# Altium PCB PCB_STM32-v1.1.PcbDoc (part 1 of 3)
Units mil, origin at the board's own origin, x right, y up, seen from the top; angles counter-clockwise.
Board outline 4000 x 2000 mil, 2 copper layers (Top Layer, Bottom Layer), stack 61.811 mil thick; 77 components, 88 nets, 371 pads, 188 vias.
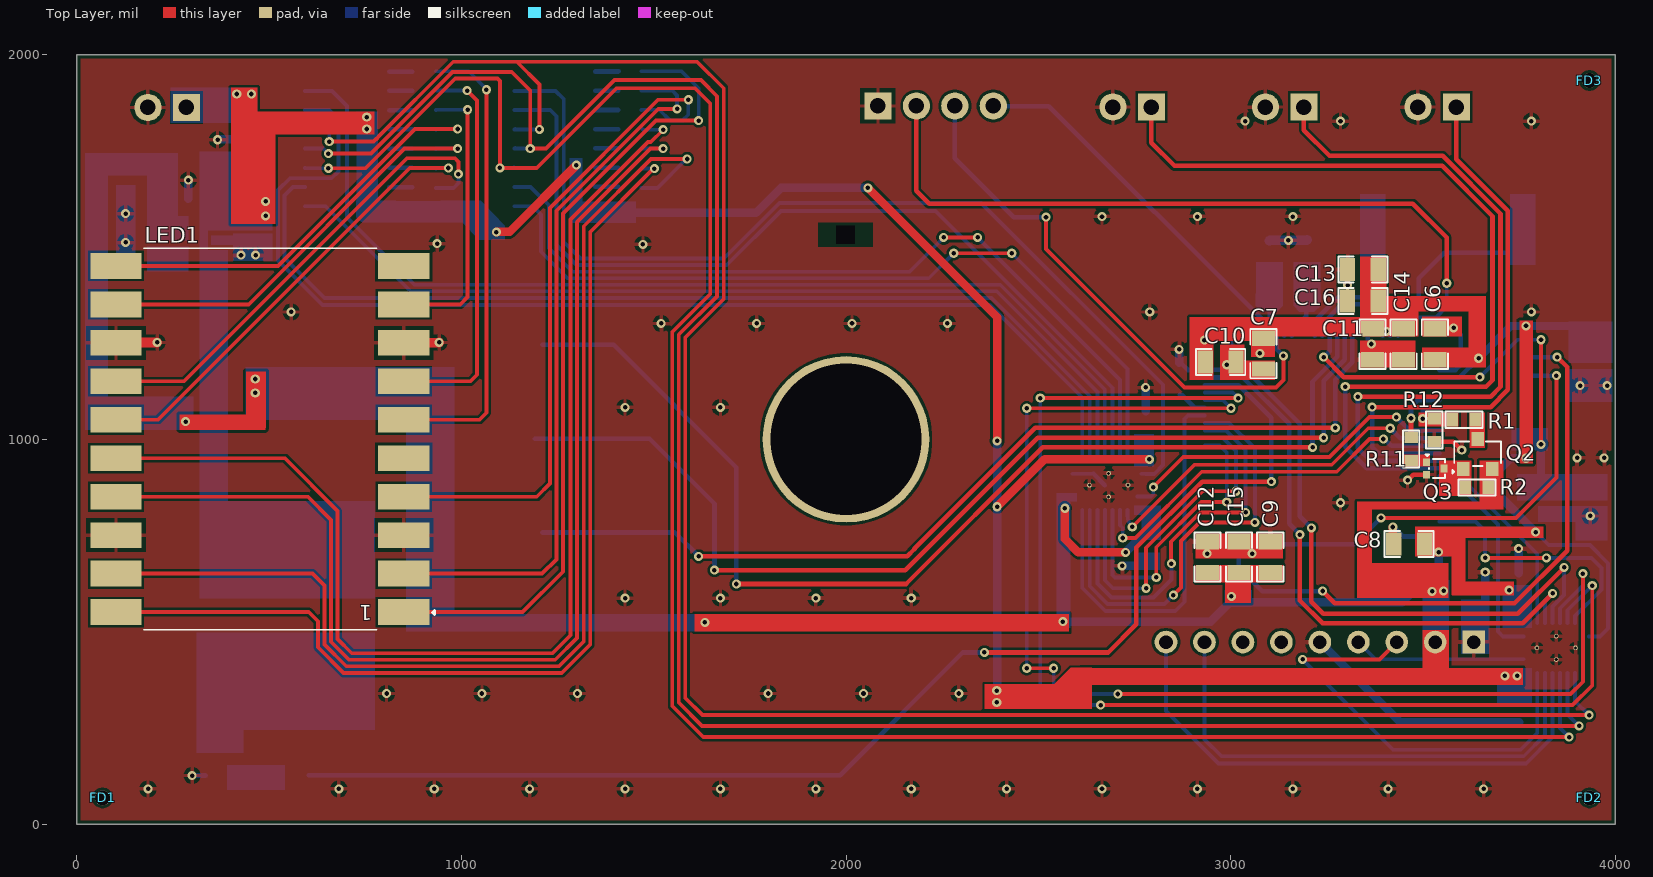
[diagram p0: Top Layer view]
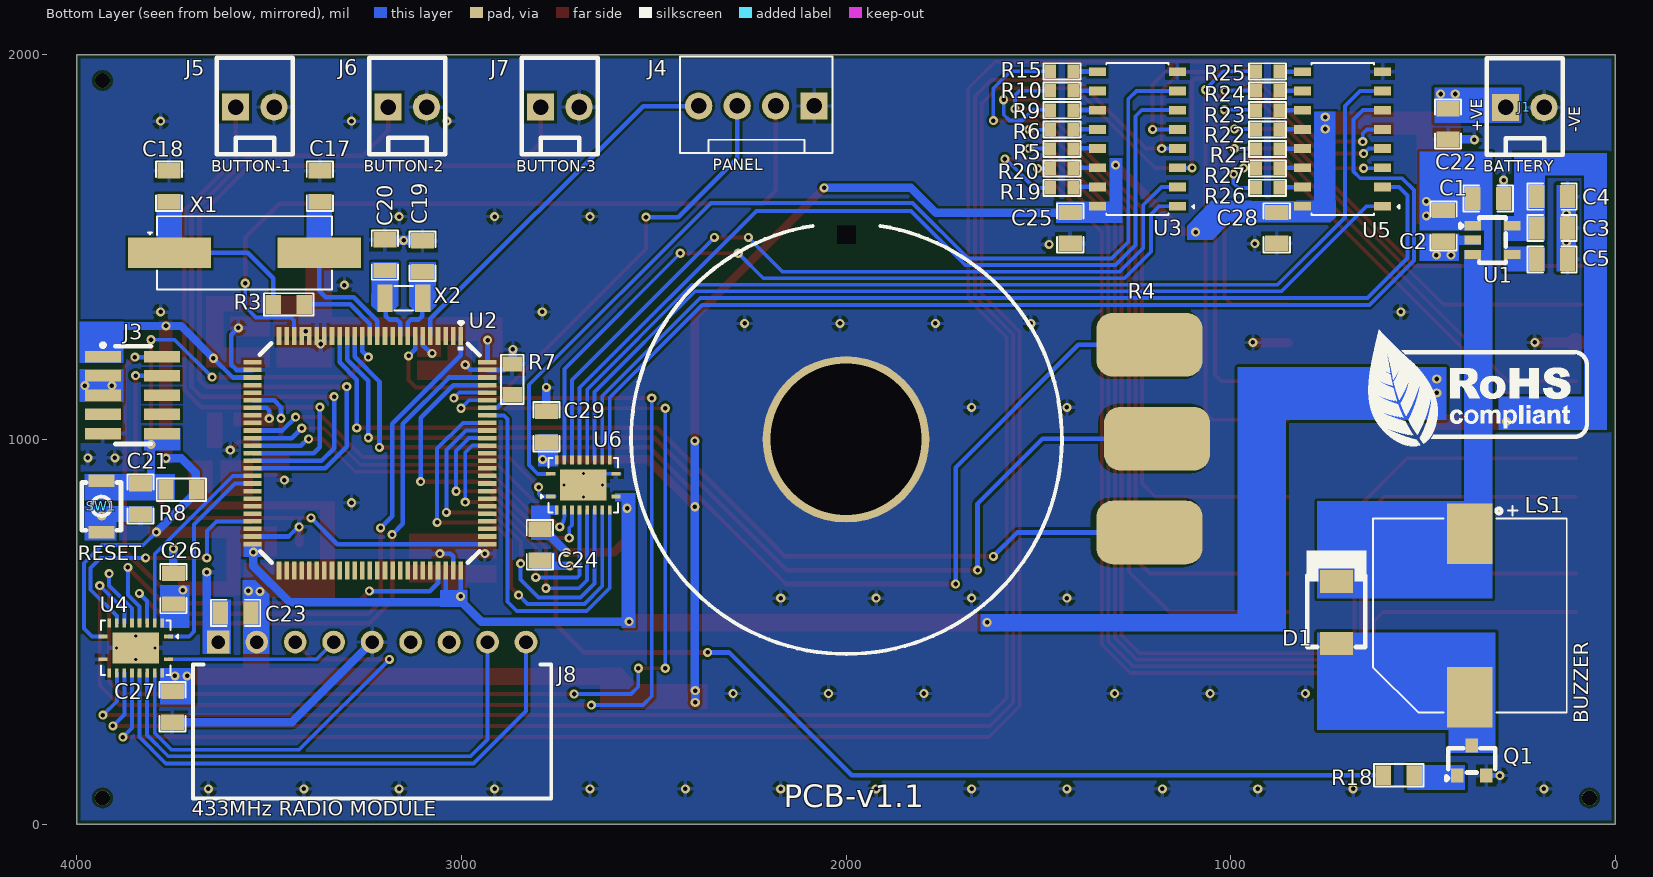
[diagram p1: Bottom Layer view, seen from below]
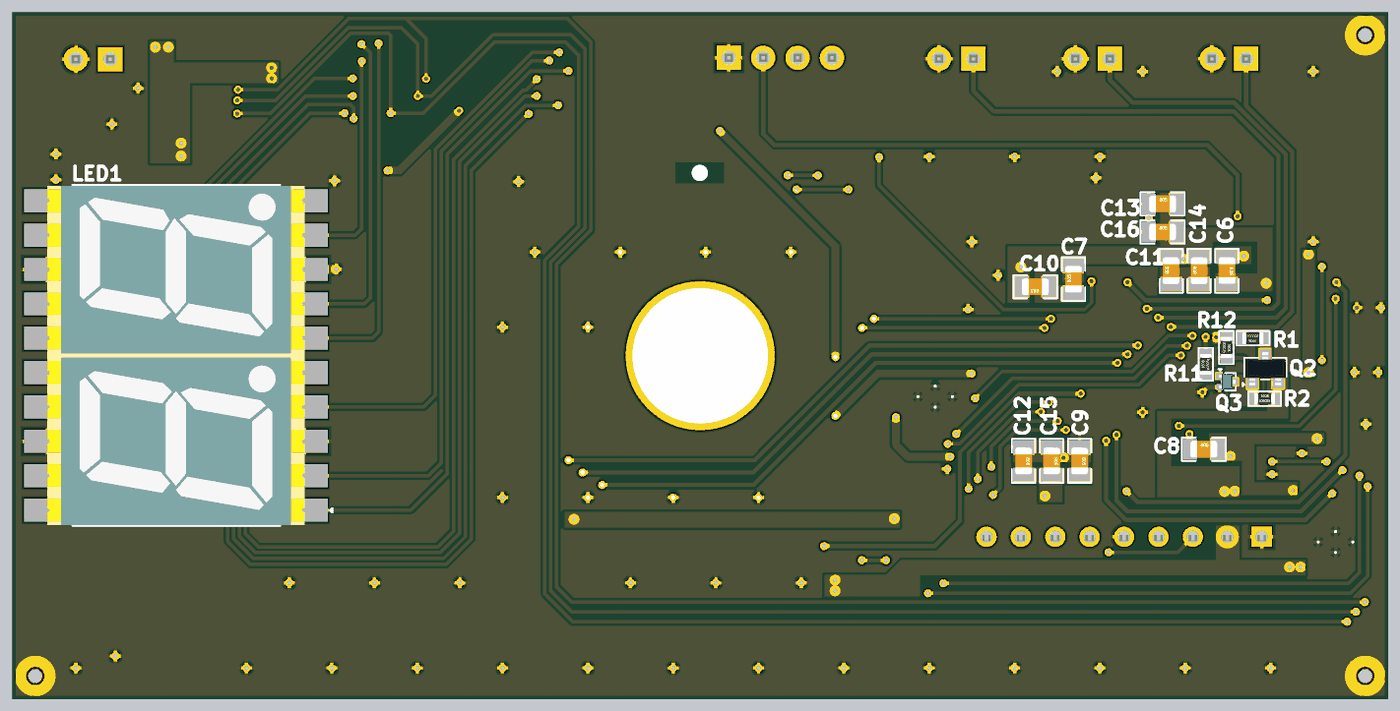
[diagram p3: 3D render of the assembled board from above, using the file's embedded part models]
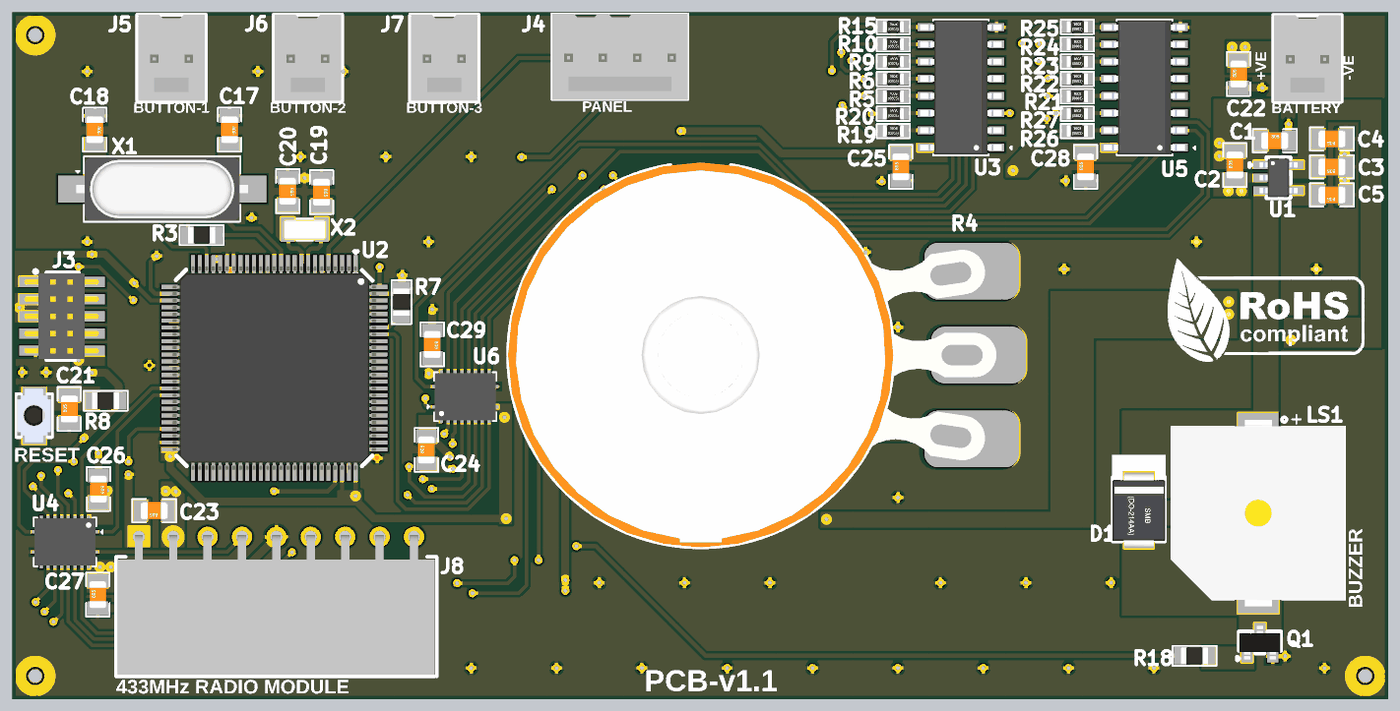
[diagram p4: 3D render of the assembled board from below, using the file's embedded part models]

## Layer stack, top to bottom
Top Solder: solder mask 0.3937, Solder Resist, Dk 3.5
Top Layer: signal copper 1.378
Dielectric 1: core 59.0551, Dielectric, Dk 4.8
Bottom Layer: signal copper 1.378
Bottom Solder: solder mask 0.3937, Solder Resist, Dk 3.5

## Board outline
0,0 4000,0 4000,2000 0,2000

## Design rules (kind name [scope] priority, off if disabled: settings)
BoardOutlineClearance [All] p1: gap=0 ignorepadtopadclearanceinfootprint=FALSE except(10: Poly-OutlineEdge)
Clearance [All] p1: gap=7 ignorepadtopadclearanceinfootprint=FALSE except(4: Arc-SMDPad Track-SMDPad SMDPad-SMDPad)
HoleSize [All] p1: absolutevalues=TRUE maxlimit=1000 minlimit=1 maxpercent=80.000 minpercent=20.000
HoleToHoleClearance [All] p1: gap=2 allowstackedmicrovias=TRUE
MinimumSolderMaskSliver [All] p1: minsoldermaskwidth=0
PolygonConnect [All] p1: connectstyle=Relief reliefconductorwidth=10 reliefentries=4 polygonreliefangle="90 Angle" airgapwidth=10
RoutingVias [All] p1: holewidth=11.81 width=23.62 viastyle="Through Hole" minholewidth=11.81 minwidth=23.62 maxholewidth=11.81 maxwidth=23.62
SilkToSilkClearance [All] p1: silktosilkclearance=0
SilkToSolderMaskClearance [IsPad] p1: minsilkscreentomaskgap=0 clearancetoexposedcopper=TRUE
SolderMaskExpansion [All] p1: expansion=4 istentingtop=FALSE
UnRoutedNet [All] p1: checkbadconnections=TRUE
Width [All] p1: maxlimit=50 minlimit=10 preferedwidth=12 minimp=50.000000 maximp=50.000000 favimp=50.000000
24 further rules are at their usual default settings.

## Classes and differential pairs
component class U_Power_Sheet: C1 C2 C3 C4 C5 C22 FD1 FD2 FD3 J1 U1
component class U_Peripheral_Sheet: C23 C24 C25 C26 C27 C28 C29 D1 J4 J5 J6 J7 J8 LED1 LS1 Q1 R5 R6 R9 R10 R15 R18 R19 R20 R21 R22 R23 R24 R25 R26 R27 U3 U4 U5 U6
component class U_Controller_Sheet: C6 C7 C8 C9 C10 C11 C12 C13 C14 C15 C16 C17 C18 C19 C20 C21 J3 Q2 Q3 R1 R2 R3 R4 R7 R8 R11 R12 SW1 U2 X1 X2

## Components (designator, comment, footprint, x,y, rotation, side; value= is the part's Value field where it differs from the comment)
C1 "0.1uF" CAP-0805 330,1626 r180 bottom locked value=100nF
C2 "10uF" CAP-0805 446,1555 r90 bottom locked
C3 "0.1uF" CAP-0805 164,1549.5 r0 bottom locked value=100nF
C4 "10uF" CAP-0805 164,1631 r0 bottom locked
C5 "22nF" CAP-0805 164,1468 r0 bottom locked
C6 "0.1uF" CAP-0805 3531,1247.5 r270 top locked value=100nF
C7 "0.1uF" CAP-0805 3085,1223 r90 top locked value=100nF
C8 "0.1uF" CAP-0805 3464,728 r0 top locked value=100nF
C9 "0.1uF" CAP-0805 3103,694 r270 top locked value=100nF
C10 "0.1uF" CAP-0805 2974,1201 r180 top locked value=100nF
C11 "1uF" CAP-0805 3369,1247.5 r90 top locked
C12 "1uF" CAP-0805 2940,694 r270 top locked
C13 "1uF" CAP-0805 3344,1442 r0 top locked
C14 "0.1uF" CAP-0805 3450,1247.5 r90 top locked value=100nF
C15 "0.1uF" CAP-0805 3021.5,694 r270 top locked value=100nF
C16 "0.1uF" CAP-0805 3344,1360 r0 top locked value=100nF
C17 "20pF" CAP-0805 3368,1658 r270 bottom locked
C18 "20pF" CAP-0805 3760,1658 r270 bottom locked
C19 "20pF" CAP-0805 3101,1476 r270 bottom locked
C20 "20pF" CAP-0805 3199,1479 r270 bottom locked
C21 "0.1uF" CAP-0805 3834,845 r90 bottom locked value=100nF
C22 "0.1uF" CAP-0805 435,1820 r90 bottom locked value=100nF
C23 "0.1uF" CAP-0805 3587,549 r0 bottom locked value=100nF
C24 "0.1uF" CAP-0805 2796,726 r90 bottom value=100nF
C25 "0.1uF" CAP-0805 1417,1550 r90 bottom value=100nF
C26 "0.1uF" CAP-0805 3749,612 r270 bottom locked value=100nF
C27 "0.1uF" CAP-0805 3751,305 r90 bottom locked value=100nF
C28 "0.1uF" CAP-0805 880,1550 r90 bottom value=100nF
C29 "0.1uF" CAP-0805 2779,1033 r270 bottom value=100nF
D1 "MURS120-E3/5BT" "DO-214AA (SMB)" 725,550 r270 bottom locked
FD1 "Fiducial Mark" "Fiducial mark" 67,68 r0 top locked
FD2 "Fiducial Mark" "Fiducial mark" 3933,68 r0 top locked
FD3 "Fiducial Mark" "Fiducial mark" 3933,1933 r0 top locked
J1 "022232021" 022232021 235,1863 r180 bottom locked
J3 "20021121-00010C4LF" 20021121-00010C4LF_ 3855,1115 r270 bottom locked
J4 "0022232041" 0022232041 2233,1867 r0 bottom locked
J5 "022232021" 022232021 3537,1864 r180 bottom locked
J6 "022232021" 022232021 3140.5,1864 r180 bottom locked
J7 "022232021" 022232021 2744,1864 r180 bottom locked
J8 "PPTC091LGBN-RC" "HDR 1x9 Female R/A" 3632,473 r180 bottom locked
LED1 "ACDC56-41SURKWA-F01" ACDC56-41SURKWA-F01 476,1001 r180 top locked
LS1 "CT-1205CL-SMT-TR" CT-1205CL-SMT-TR 378,542 r270 bottom locked
Q1 "BC849C-TP" SOT-23 373,165 r180 bottom locked
Q2 "AO3407" SOT-23 3642.5,962 r0 top locked
Q3 "MMBT3904M" SOT-723 3532.14,924.25 r270 top locked
R1 "172k" Res-0603 3606.5,1051 r0 top locked
R2 "1K" Res-0603 3640.5,875 r180 top locked
R3 "390R" RES-0805 3449,1351 r180 bottom locked
R4 "50K" RV4NAYSD503A 2000,1000 r90 bottom locked value=50kR
R5 "100R" Res-0603 1438.68,1755 r0 bottom locked
R6 "100R" Res-0603 1438.68,1805.5 r0 bottom locked
R7 "10K" RES-0805 2868,1156 r270 bottom value=10kR
R8 "10K" RES-0805 3728,869 r0 bottom locked value=10kR
R9 "100R" Res-0603 1438.68,1856 r0 bottom locked
R10 "100R" Res-0603 1438.68,1906.5 r0 bottom locked
R11 "4.7K" Res-0603 3469.5,975 r270 top locked
R12 "330K" Res-0603 3529.5,1024 r90 top locked value=330kR
R15 "100R" Res-0603 1438.68,1957 r0 bottom locked
R18 "1K" RES-0805 563,127 r180 bottom locked value=1kR
R19 "100R" Res-0603 1438.68,1654 r0 bottom locked
R20 "100R" Res-0603 1438.68,1704.5 r0 bottom locked
R21 "100R" Res-0603 904,1755 r0 bottom
R22 "100R" Res-0603 904,1805.5 r0 bottom
R23 "100R" Res-0603 904,1856 r0 bottom
R24 "100R" Res-0603 904,1906.5 r0 bottom
R25 "100R" Res-0603 904,1957 r0 bottom
R26 "100R" Res-0603 904,1654 r0 bottom
R27 "100R" Res-0603 904,1704.5 r0 bottom
SW1 "B3U-1000P" B3U-1000P 3936,826 r270 bottom locked
U1 "RT9193-33GB" SOT-23-5 319,1518 r180 bottom locked
U2 "STM32L071V8T6" LQFP-100 3238,964 r270 bottom locked
U3 "MC14511BDG" "16-SOIC (0.154\", 3.90mm Width)" 1242.29,1781 r0 bottom
U4 "TXB0108RGYR" "20-VFQFN Exposed Pad" 3846.62,457.97 r270 bottom locked
U5 "MC14511BDG" "16-SOIC (0.154\", 3.90mm Width)" 708.71,1781 r0 bottom
U6 "TXB0108RGYR" "20-VFQFN Exposed Pad" 2683,881 r90 bottom
X1 "8MHz" J49SMH-B-G-G-K-8M0 3564.12,1485 r180 bottom locked
X2 "32.768KHz" MU00525-32.768K 3149.79,1367 r180 bottom locked

## Footprints (in the part's own frame and the unit in brackets; to place one, negate y for a bottom-side part, rotate by r counter-clockwise, add the part's x,y. Pads: shape width x height; smd on the part's side, far side on the other; paste and mask are expansions set on the pad)
"16-SOIC (0.154\", 3.90mm Width)" [mm]
  rect 1.12x0.58 smd: 1(-2.64,4.445) 2(-2.64,3.175) 3(-2.64,1.905) 4(-2.64,0.635) 5(-2.64,-0.635) 6(-2.64,-1.905) 7(-2.64,-3.175) 8(-2.64,-4.445) 9(2.64,-4.445) 10(2.64,-3.175) 11(2.64,-1.905) 12(2.64,-0.635) 13(2.64,0.635) 14(2.64,1.905) 15(2.64,3.175) 16(2.64,4.445)
  silkscreen extent -3.74,-5.03 2.06,5.03, body extent -3,-4.95 3,4.95, height 1.75
"20-VFQFN Exposed Pad" [mm]
  rect 0.24x0.6 smd: 1(-0.75,2.15) 10(-0.75,-2.15) 11(0.75,-2.15) 20(0.75,2.15)
  rect 0.6x0.24 smd: 2(-1.65,1.75) 3(-1.65,1.25) 4(-1.65,0.75) 5(-1.65,0.25) 6(-1.65,-0.25) 7(-1.65,-0.75) 8(-1.65,-1.25) 9(-1.65,-1.75) 12(1.65,-1.75) 13(1.65,-1.25) 14(1.65,-0.75) 15(1.65,-0.25) 16(1.65,0.25) 17(1.65,0.75) 18(1.65,1.25) 19(1.65,1.75)
  round 0.3 hole 0.2 mask+0: 21(-0.775,0) 21(0,-1.275) 21(0,1.275) 21(0.775,0)
  rect 2.05x3.05 smd paste-3: 21(0,0)
  silkscreen extent -1.8,-2.3 1.8,2.79, body extent -1.75,-2.25 1.75,2.25, height 1
20021121-00010C4LF_ [mm]
  rect 0.76x2.4 smd: 1(-2.54,-1.95) 2(-2.54,1.95) 3(-1.27,-1.95) 4(-1.27,1.95) 5(0,-1.95) 6(0,1.95) 7(1.27,-1.95) 8(1.27,1.95) 9(2.54,-1.95) 10(2.54,1.95)
  silkscreen extent -3.43,-2.08 3.23,1.22, body extent -3.17,-2.78 3.18,2.72, height 4.5
022232021 [mm]
  rect 1.8x1.8 hole 1.02: 1(-1.27,0)
  round 1.8 hole 1.02: 2(1.27,0)
  silkscreen extent -2.51,-3.12 2.51,3.25, body extent -2.46,-3.1 2.46,3.25, height 10.88
0022232041 [mm]
  rect 1.8x1.8 hole 1.02: 1(-3.81,0)
  round 1.8 hole 1.02: 2(-1.27,0) 3(1.27,0) 4(3.81,0)
  silkscreen extent -5.03,-3.28 5.05,3.1, body extent -5,-3.25 5,3.1, height 10.88
ACDC56-41SURKWA-F01 [mm]
  rect 3.4x1.7 smd: 1(-9.5,11.43) 2(-9.5,8.89) 3(-9.5,6.35) 4(-9.5,3.81) 5(-9.5,1.27) 6(-9.5,-1.27) 7(-9.5,-3.81) 8(-9.5,-6.35) 9(-9.5,-8.89) 10(-9.5,-11.43) 11(9.5,-11.43) 12(9.5,-8.89) 13(9.5,-6.35) 14(9.5,-3.81) 15(9.5,-1.27) 16(9.5,1.27) 17(9.5,3.81) 18(9.5,6.35) 19(9.5,8.89) 20(9.5,11.43)
  silkscreen extent -11.53,-12.6 7.65,12.6, body extent -9.5,-12.55 9.5,12.55, height 3.8
B3U-1000P [mm] "SWITCH TACTILE SPST-NO 0.05A 12V"
  rect 0.82x1.72 smd: 1(-1.7,0) 2(1.7,0)
  silkscreen extent -1.57,-1.3 1.57,1.3, body extent -2,-1.26 2,1.24, height 1.6
CAP-0805 [mil] "SMD 0805"
  rect 40x60 smd mask+2.76: 1(-40,0) 2(40,0)
  silkscreen extent -64,-34 64,34, body extent -39,-25 39,25, height 30
CT-1205CL-SMT-TR [mm]
  rect 4x3 smd: 1(-5.4,0) 2(5.4,0)
  silkscreen extent -7.25,-6.4 6.4,6.4, body extent -6.9,-6.4 6.9,6.4, height 7.1
"DO-214AA (SMB)" [mm]
  rect 1.52x2.18 smd: 1(-2.035,0) 2(2.035,0)
  silkscreen extent -4.1,-1.98 2.28,1.98, body extent -2.75,-1.95 2.75,1.95, height 2.45
"Fiducial mark" [mm]
  round 1 hole 1 paste-1 mask+1: 1(0,0)
"HDR 1x9 Female R/A" [mm]
  rect 1.5x1.5 hole 0.9: 1(0,0)
  round 1.5 hole 0.9: 2(2.54,0) 3(5.08,0) 4(7.62,0) 5(10.16,0) 6(12.7,0) 7(15.24,0) 8(17.78,0) 9(20.32,0)
  silkscreen extent -1.67,-10.33 21.99,-1.47, body extent -1.52,-10.17 21.84,0.13, height 2.54
J49SMH-B-G-G-K-8M0 [mm]
  rect 5.5x2 smd: 1(-4.95,0) 1(-4.95,0) 1(-4.95,0) 2(4.95,0)
  silkscreen extent -6.36,-2.42 5.78,2.42, body extent -6.35,-2.35 6.35,2.35, height 4.16
LQFP-100 [mm]
  rect 1.2x0.3 smd: 1(-7.75,6) 2(-7.75,5.5) 3(-7.75,5) 4(-7.75,4.5) 5(-7.75,4) 6(-7.75,3.5) 7(-7.75,3) 8(-7.75,2.5) 9(-7.75,2) 10(-7.75,1.5) 11(-7.75,1) 12(-7.75,0.5) 13(-7.75,0) 14(-7.75,-0.5) 15(-7.75,-1) 16(-7.75,-1.5) 17(-7.75,-2) 18(-7.75,-2.5) 19(-7.75,-3) 20(-7.75,-3.5) 21(-7.75,-4) 22(-7.75,-4.5) 23(-7.75,-5) 24(-7.75,-5.5) 25(-7.75,-6) 51(7.75,-6) 52(7.75,-5.5) 53(7.75,-5) 54(7.75,-4.5) 55(7.75,-4) 56(7.75,-3.5) 57(7.75,-3) 58(7.75,-2.5) 59(7.75,-2) 60(7.75,-1.5) 61(7.75,-1) 62(7.75,-0.5) 63(7.75,0) 64(7.75,0.5) 65(7.75,1) 66(7.75,1.5) 67(7.75,2) 68(7.75,2.5) 69(7.75,3) 70(7.75,3.5) 71(7.75,4) 72(7.75,4.5) 73(7.75,5) 74(7.75,5.5) 75(7.75,6)
  rect 0.3x1.2 smd: 26(-6,-7.75) 27(-5.5,-7.75) 28(-5,-7.75) 29(-4.5,-7.75) 30(-4,-7.75) 31(-3.5,-7.75) 32(-3,-7.75) 33(-2.5,-7.75) 34(-2,-7.75) 35(-1.5,-7.75) 36(-1,-7.75) 37(-0.5,-7.75) 38(0,-7.75) 39(0.5,-7.75) 40(1,-7.75) 41(1.5,-7.75) 42(2,-7.75) 43(2.5,-7.75) 44(3,-7.75) 45(3.5,-7.75) 46(4,-7.75) 47(4.5,-7.75) 48(5,-7.75) 49(5.5,-7.75) 50(6,-7.75) 76(6,7.75) 77(5.5,7.75) 78(5,7.75) 79(4.5,7.75) 80(4,7.75) 81(3.5,7.75) 82(3,7.75) 83(2.5,7.75) 84(2,7.75) 85(1.5,7.75) 86(1,7.75) 87(0.5,7.75) 88(0,7.75) 89(-0.5,7.75) 90(-1,7.75) 91(-1.5,7.75) 92(-2,7.75) 93(-2.5,7.75) 94(-3,7.75) 95(-3.5,7.75) 96(-4,7.75) 97(-4.5,7.75) 98(-5,7.75) 99(-5.5,7.75) 100(-6,7.75)
  silkscreen extent -8.64,-7.27 7.24,7.24, body extent -8,-8 8,8, height 1.6
MU00525-32.768K [mm]
  rect 1x1.8 on Mech1: 1(-1.25,0)
  rect 1x1.8 smd: 1(-1.25,0) 1(-1.25,0) 2(1.25,0)
  silkscreen extent -0.61,-0.81 0.61,0.81, body extent -1.6,-0.75 1.6,0.75, height 0.9
Res-0603 [mil]
  rect 30x35 smd: 1(-30,0) 2(30,0)
  silkscreen extent -48,-21 48,21, body extent -31,-17 31,17, height 18
RES-0805 [mil] "SMD 0805"
  rect 40x50 smd: 1(-40,0) 2(40,0)
  silkscreen extent -64,-29 64,29, body extent -39,-25 39,24, height 24
RV4NAYSD503A [mm]
  rrect50% 4.2x7 smd: 1(6.253,-20.044) 2(0.053,-20.542) 3(-6.147,-20.044)
  round 0 hole 1.2 square unplated: MH(13.513,-0.032)
  silkscreen extent -14.17,-14.26 14.1,14.19, body extent -14.17,-21.88 14.28,14.19, height 22.34
SOT-23 [mm] "TRANS NPN 40V 0.6A SOT23"
  rect 0.82x0.92 smd: 1(-0.95,-1) 2(0.95,-1) 3(0,1)
  silkscreen extent -1.68,-1.3 1.55,0.81, body extent -1.5,-1.25 1.5,1.25, height 1.05
SOT-23-5 [mm]
  rect 1.1x0.6 smd: 1(-1.3,0.95) 2(-1.3,0) 3(-1.3,-0.95) 4(1.3,-0.95) 5(1.3,0.95)
  silkscreen extent -2.13,-1.5 0.88,1.5, body extent -1.4,-1.45 1.4,1.45, height 1.45
SOT-723 [mm]
  rect 0.5x0.45 smd: 1(-0.4,-0.575) 2(0.4,-0.575) 3(0,0.575)
  silkscreen extent -0.94,-0.66 0.64,0.64, body extent -0.6,-0.6 0.6,0.6, height 0.5

## Part data
C1 C3 C6 C7 C8 C9 C10 C14 C15 C16 C21 C22 C23 C24 C25 C26 C27 C28 C29: library part CL21B104KBCNNNC, "Multilayer Ceramic Capacitor, 0.1 uF, 50 V, ± 10%, X7R, 0805 [2012 Metric]", Case Code (Imperial)=0805, Case Code (Metric)=2012, Dielectric=X7R, Manufacturer=Samsung, Max Operating Temperature=125°C, Min Operating Temperature=-55°C, Supplier Part Number=1276-1003-1-ND, Tolerance=10%, Voltage=50V, Case/Package=0805, Category="Ceramic Capacitors", ComponentLink1Description=https://datasheet.ciiva.com/25710/cl21b104kbcnnnc-25710182.pdf?src-supplier=Digikey, ComponentLink1URL=https://datasheet.ciiva.com/25710/cl21b104kbcnnnc-25710182.pdf?src-supplier=Digikey, ComponentLink2Description=https://datasheet.ciiva.com/29199/454152-da-01-en-vs-kondensator-0805-29199814.pdf?src-supplier=Conrad, ComponentLink2URL=https://datasheet.ciiva.com/29199/454152-da-01-en-vs-kondensator-0805-29199814.pdf?src-supplier=Conrad, Construction=Flat, Depth=1.25mm, Height=0.85mm, Item Type=Capacitor, Lead Free=5697LeadFree, Length=2mm, Manufacturer Part Number=CL21B104KBCNNNC, Material=Ceramic, Mounting Technology="Surface Mount", Packaging="Tape and Reel", Pricing="1=0.1, 10=0.042, 50=0.024, 100=0.0186, 500=0.01404, 1000=0.01103 (USD)", Radiation Hardening=No, RoHS=Yes, RoHS Compliant=Yes, Series=CL, Stock=2193973, Supplier=Digikey, Thickness=0.037inch, Voltage Rating=50V, Voltage Rating (DC)=50V, Width=0.049inch
C2 C4: library part CL21A106KOQNNNE, "Multilayer Ceramic Capacitor, 10 uF, 16 V, ± 10%, X5R, 0805 [2012 Metric]", Case Code (Imperial)=0805, Case Code (Metric)=2012, Dielectric=X7R, LCSC Part Number=C1713, Manufacturer=Samsung, Max Operating Temperature=85°C, Min Operating Temperature=-55°C, Package Quantity=1, Supplier Part Number=1276-1096-1-ND, Tolerance=10%, Voltage=16V, Case/Package=0805, Category="Ceramic Capacitors", ComponentLink1Description=https://datasheet.ciiva.com/25798/cl21a106koqnnne-25798133.pdf?src-supplier=Digikey, ComponentLink1URL=https://datasheet.ciiva.com/25798/cl21a106koqnnne-25798133.pdf?src-supplier=Digikey, Construction=Flat, Depth=1.25mm, Height=1.25mm, Item Type=Capacitor, Lead Free="Lead Free", Length=2mm, Manufacturer Part Number=CL21A106KOQNNNE, Material=Ceramic, Mounting Technology="Surface Mount", Package=0805, Packaging="Tape and Reel", Pricing="1=0.1, 10=0.07, 50=0.0404, 100=0.0313, 500=0.02354, 1000=0.0185 (USD)", Radiation Hardening=No, RoHS=Yes, RoHS Compliant=Yes, Series=CL, Stock=4169901, Supplier=Digikey, Thickness=0.055inch, Voltage Rating=16V, Voltage Rating (DC)=16V, Width=0.049inch
C5: library part CL21B223KBANNNC, "Multilayer Ceramic Capacitor, 0.022 uF, 50 V, ± 10%, X7R, 0805 [2012 Metric]", Case Code (Imperial)=0805, Case Code (Metric)=2012, Dielectric=X7R, LCSC Part Number=C1729, Manufacturer=Samsung, Max Operating Temperature=125°C, Min Operating Temperature=-55°C, Package Quantity=1, Supplier Part Number=1276-1081-1-ND, Tolerance=10%, Voltage=50V, Case/Package=0805, Category="Ceramic Capacitors", ComponentLink1Description=https://datasheet.ciiva.com/25800/cl21b223kbannnc-25800850.pdf?src-supplier=Digikey, ComponentLink1URL=https://datasheet.ciiva.com/25800/cl21b223kbannnc-25800850.pdf?src-supplier=Digikey, ComponentLink2Description=https://datasheet.ciiva.com/26838/getdatasheetpartid-498011-26838697.pdf?src-supplier=Verical, ComponentLink2URL=https://datasheet.ciiva.com/26838/getdatasheetpartid-498011-26838697.pdf?src-supplier=Verical, ComponentLink3Description=https://datasheet.ciiva.com/29199/454724-da-01-en-vs-kondensator-0805-29199517.pdf?src-supplier=Conrad, ComponentLink3URL=https://datasheet.ciiva.com/29199/454724-da-01-en-vs-kondensator-0805-29199517.pdf?src-supplier=Conrad, Construction=Flat, Depth=1.25mm, Height=0.65mm, Item Type=Capacitor, Lead Free="Lead Free", Length=2mm, Manufacturer Part Number=CL21B223KBANNNC, Material=Ceramic, Mounting Technology="Surface Mount", Package=0805, Packaging="Tape and Reel", Pricing="1=0.1, 10=0.032, 50=0.0184, 100=0.0143, 500=0.01074, 1000=0.00844 (USD)", Radiation Hardening=No, RoHS=Yes, RoHS Compliant=Yes, Series=CL, Stock=135727, Supplier=Digikey, Thickness=0.03inch, Voltage Rating=50V, Voltage Rating (DC)=50V, Width=0.049inch
C11 C12 C13: library part CL21B105KAFNNNE, "Multilayer Ceramic Capacitor, 1 uF, 25 V, ± 10%, X7R, 0805 [2012 Metric]", Case Code (Imperial)=0805, Case Code (Metric)=2012, Dielectric=X7R, Manufacturer=Samsung, Max Operating Temperature=125°C, Min Operating Temperature=-55°C, Package Quantity=1, Supplier Part Number=1276-1066-1-ND, Tolerance=10%, Voltage=25V, Case/Package=0805, Category="Ceramic Capacitors", ComponentLink1Description=https://datasheet.ciiva.com/25800/cl21b105kafnnne-25800163.pdf?src-supplier=Digikey, ComponentLink1URL=https://datasheet.ciiva.com/25800/cl21b105kafnnne-25800163.pdf?src-supplier=Digikey, ComponentLink2Description=https://datasheet.ciiva.com/15195/getdatasheetpartid-355205-15195880.pdf?src-supplier=Verical, ComponentLink2URL=https://datasheet.ciiva.com/15195/getdatasheetpartid-355205-15195880.pdf?src-supplier=Verical, Construction=Flat, Depth=1.25mm, Height=1.25mm, Item Type=Capacitor, Lead Free="Lead Free", Length=2mm, Manufacturer Part Number=CL21B105KAFNNNE, Mounting Technology="Surface Mount", Packaging="Tape and Reel", Pricing="1=0.1, 10=0.062, 50=0.0356, 100=0.0276, 500=0.02078, 1000=0.01633 (USD)", Radiation Hardening=No, RoHS=Yes, RoHS Compliant=Yes, Series=CL, Stock=911796, Supplier=Digikey, Thickness=0.053inch, Voltage Rating=25V, Voltage Rating (DC)=25V, Width=0.049inch
C17 C18 C19 C20: library part C0805C200J5HAC7800, "Cap Cer 0805 20PF 50V Ultra Stab", Manufacturer=KEMET, Package=0805, Supplier Part Number=399-C0805C200J5HAC7800CT-ND, Category="Ceramic Capacitors", Item Type=Capacitor, Manufacturer Part Number=C0805C200J5HAC7800, Pricing="1=0.1, 10=0.069, 50=0.0394, 100=0.0305, 500=0.02298, 1000=0.01805 (USD)", RoHS=Yes, Stock=20467, Supplier=Digikey
D1: "Rectifier Diode Switching 200V 2A 35ns 2-Pin SMB T/R", Average Rectified Current=2A, Case/Package=SMB, Current=1A, Manufacturer="Vishay Semiconductors", Max Operating Temperature=175°C, Max Repetitive Reverse Voltage (Vrrm)=200V, Max Reverse Current=2uA, Max Surge Current=40A, Min Operating Temperature=-65°C, Package="DO-214AA (SMB)", Package Quantity=3200, Supplier Part Number=MURS120-E3/5BTGICT-ND, Category="Rectifier Diodes", ComponentLink1Description=http://www.mouser.com/ds/2/427/88687-240345.pdf?src-supplier=Mouser, ComponentLink1URL=http://www.mouser.com/ds/2/427/88687-240345.pdf?src-supplier=Mouser, ComponentLink2Description=http://components.arrow.com/part/dataview/42678636S6900221N5680?src-supplier=Arrow+Electronics, ComponentLink2URL=http://components.arrow.com/part/dataview/42678636S6900221N5680?src-supplier=Arrow+Electronics, ComponentLink3Description=http://www.vishay.com/docs/88687/murs120.pdf?src-supplier=Digikey, ComponentLink3URL=http://www.vishay.com/docs/88687/murs120.pdf?src-supplier=Digikey, ComponentLink4Description=http://www.vishay.com/docs/88687/88687.pdf?src-supplier=Avnet, ComponentLink4URL=http://www.vishay.com/docs/88687/88687.pdf?src-supplier=Avnet, Forward Current=2A, Item Type=Diode, Manufacturer Part Number=MURS120-E3/5BT, Max Reverse Voltage (DC)=200V, Mounting Technology="Surface Mount", Packaging="Tape and Reel", Peak Non-Repetitive Surge Current=40A, Pins=2, Pricing="1=0.44, 10=0.378, 100=0.2629, 500=0.20524, 1000=0.16682 (USD)", Radiation Hardening=No, Recovery Time=35ns, Reverse Recovery Time=35ns, Reverse Voltage=200V, RoHS=Yes, RoHS Compliant=Yes, Series=-, Stock=22917, Supplier=Digikey, Voltage=200V
J1 J5 J6 J7: "CONN HEADER VERT 2POS 2.54MM", Manufacturer=Molex, Supplier Part Number=538-22-23-2021, Category=Uncategorized, Manufacturer Part Number=022232021, Pricing="1=0.21, 10=0.127, 50=0.127, 100=0.096, 1000=0.086, 10000=0.073 (USD)", RoHS=No, Stock=51848, Supplier=Mouser
J3: "CONN HEADER SMD 10POS 1.27MM", Color=Black, Contact Resistance=30mR, Current Rating=1A, Insulation Resistance=100MR, LCSC Part Number=C150517, Manufacturer="Amphenol FCI", Max Operating Temperature=85°C, Max Voltage Rating (AC)=125V, Min Operating Temperature=-40°C, Package Quantity=600, Supplier Part Number 1=609-3695-6-ND, ComponentLink1Description=https://www.verical.com/server-webapp/html/getDatasheet?partID=177140&src-supplier=Verical, ComponentLink1URL=https://www.verical.com/server-webapp/html/getDatasheet?partID=177140&src-supplier=Verical, ComponentLink2Description=http://portal.fciconnect.com/Comergent/fci/drawing/20021121.pdf?src-supplier=Avnet, ComponentLink2URL=http://portal.fciconnect.com/Comergent/fci/drawing/20021121.pdf?src-supplier=Avnet, ComponentLink3Description=https://cdn.amphenol-icc.com/media/wysiwyg/files/drawing/20021121.pdf?src-supplier=Digi-Key, ComponentLink3URL=https://cdn.amphenol-icc.com/media/wysiwyg/files/drawing/20021121.pdf?src-supplier=Digi-Key, ComponentLink4Description=http://portal.fciconnect.com/Comergent/fci/drawing/20021121.pdf?src-supplier=Avnet+Europe, ComponentLink4URL=http://portal.fciconnect.com/Comergent/fci/drawing/20021121.pdf?src-supplier=Avnet+Europe, ComponentLink5Description=https://media.digikey.com/pdf/Data%20Sheets/FCI%20PDFs/Minitek%20127_Catalog.pdf?src-supplier=Digi-Key, ComponentLink5URL=https://media.digikey.com/pdf/Data%20Sheets/FCI%20PDFs/Minitek%20127_Catalog.pdf?src-supplier=Digi-Key, ComponentLink6Description=http://portal.fciconnect.com/Comergent//fci/drawing/20021121.pdf?src-supplier=Mouser, ComponentLink6URL=http://portal.fciconnect.com/Comergent//fci/drawing/20021121.pdf?src-supplier=Mouser, Connector Type="Male Pin,Header", Contact Material="Copper Alloy,Copper,Gold", Contact Mating Length=0.12inch, Contact Plating=Gold, Depth=3.4mm, Gender=Male, Housing Color=Black, Housing Material=Thermoplastic, Item Type="Jtag Male Header", Length=6.35mm, Manufacturer Part Number=20021121-00010C4LF, Mount="Surface Mount", Number of Contacts=10, Number of Positions=10, Number of Rows=2, Orientation=Straight, Packaging="Tape and Reel", Pitch=1.27mm, Pricing 1="1=0.87, 10=0.761, 100=0.6563 (USD)", Radiation Hardening=No, REACH SVHC="No SVHC", Row Spacing=0.05inch, Stack Height=3mm, Stock 1=0, Supplier 1=Digi-Key, Termination=Solder, Voltage Rating=125V
J4: "CONN HEADER VERT 4POS 2.54MM", Manufacturer=Molex, Supplier Part Number=538-22-23-2041, Item Type="JST Connector", Manufacturer Part Number=0022232041, Pricing="1=0.33, 10=0.215, 50=0.215, 100=0.16, 1000=0.145, 10000=0.13 (USD)", RoHS=Yes, Stock=47281, Supplier=Mouser
J8: "CONN HDR 9POS 0.1 TIN PCB R/A", Flammability Rating="UL94 V-0", Housing Color=Black, Manufacturer=Sullins, Max Operating Temperature=105°C, Min Operating Temperature=-40°C, Supplier Part Number=S5445-ND, Voltage Rating=250V, Category="Headers and Wire Housings", ComponentLink1Description=https://media.digikey.com/pdf/Data%20Sheets/Sullins%20PDFs/Female_Headers.100_DS.pdf?src-supplier=Digikey, ComponentLink1URL=https://media.digikey.com/pdf/Data%20Sheets/Sullins%20PDFs/Female_Headers.100_DS.pdf?src-supplier=Digikey, Connector Type=Header, Contact Finish - Mating=TIN, Contact Material=Bronze, Contact Shape=Square, Contact Type="Female Socket", Fastening Type=Pull, Height=2.4mm, Housing Material=Plastic, Insulation Color=Black, Insulation Material=Polyester, Item Type="Female Header R/A", Lead Free="Lead Free", Length=23.4mm, Manufacturer Part Number=PPTC091LGBN-RC, Mounting Technology="Through Hole", Number of Positions=9, Number of Rows=1, Packaging=Tray, Pricing="1=0.74, 10=0.624, 80=0.5605, 440=0.45864, 1000=0.40768, 5000=0.364 (USD)", RoHS=Yes, RoHS Compliant=Yes, Series=-, Stock=254, Supplier=Digikey, Termination=Solder, Width=8.5mm
LED1: "DISPLAY 7SEG 0.56\" DBL RED 20SMD", Manufacturer=Kingbright, Supplier Part Number=ACDC56-41SURKWA-F01-ND, Category="LED Displays", ComponentLink1Description=https://datasheet.ciiva.com/12423/acdc56-41surkwa-f01-81627-12423377.pdf?src-supplier=Mouser, ComponentLink1URL=https://datasheet.ciiva.com/12423/acdc56-41surkwa-f01-81627-12423377.pdf?src-supplier=Mouser, ComponentLink2Description=https://datasheet.ciiva.com/2105/acdc56-41surkwa-f01-2105135.pdf?src-supplier=Digikey, ComponentLink2URL=https://datasheet.ciiva.com/2105/acdc56-41surkwa-f01-2105135.pdf?src-supplier=Digikey, Item Type="7-Segment LED", Manufacturer Part Number=ACDC56-41SURKWA-F01, Pricing="2000=2.31795 (USD)", RoHS=Yes, Supplier=Digikey
LS1: "12.8 mm, 5 V, 88 dB, 2.4 kHz, Surface Mount (SMT), Driving Circuit, Magnetic Audio Indicator Buzzer", Case/Package=SMD/SMT, Frequency=2.4kHz, Manufacturer=CUI, Max Operating Temperature=70°C, Min Operating Temperature=-30°C, Operating Supply Current=30mA, Package Quantity=450, Supplier Part Number=102-1267-1-ND, Voltage Rating=5V, Category=Uncategorized, ComponentLink1Description=http://www.mouser.com/ds/2/670/ct-1205cl-smt-515776.pdf?src-supplier=Mouser, ComponentLink1URL=http://www.mouser.com/ds/2/670/ct-1205cl-smt-515776.pdf?src-supplier=Mouser, ComponentLink2Description=https://www.cui.com/product/resource/digikeypdf/ct-1205cl-smt.pdf?src-supplier=Digikey, ComponentLink2URL=https://www.cui.com/product/resource/digikeypdf/ct-1205cl-smt.pdf?src-supplier=Digikey, Height=7.6mm, Lead Free="Lead Free", Length=12.8mm, Manufacturer Part Number=CT-1205CL-SMT-TR, Mounting Technology="Surface Mount", Packaging="Tape and Reel", Pricing="1=2.230000, 10=1.848000, 25=1.706400, 50=1.603400, 100=1.504100 (USD)", RoHS=No, Sensing Method=Magnetic, Stock=58213, Supplier=Digikey, Termination=Solder, Width=12.8mm
Q1: "TRANS NPN 30V 0.1A SOT23", Case/Package=SOT-23, Collector Base Voltage (VCBO)=30V, Collector-emitter Voltage-Max=500mV, Emitter Base Voltage (VEBO)=6V, Frequency=100MHz, Manufacturer=MCC, Max Collector Current=100mA, Max Operating Temperature=150°C, Max Power Dissipation=225mW, Min Operating Temperature=-55°C, Package Quantity=1, Category=BJTs, Collector Emitter Breakdown Voltage=30V, Collector Emitter Voltage (VCEO)=30V, ComponentLink1Description=https://datasheet.ciiva.com/6362/bc846a-bc849csot-23-6362344.pdf?src-supplier=Digikey, ComponentLink1URL=https://datasheet.ciiva.com/6362/bc846a-bc849csot-23-6362344.pdf?src-supplier=Digikey, ComponentLink2Description=https://datasheet.ciiva.com/6362/bc846a-bc849csot-23-6362345.pdf?src-supplier=Digikey, ComponentLink2URL=https://datasheet.ciiva.com/6362/bc846a-bc849csot-23-6362345.pdf?src-supplier=Digikey, ComponentLink3Description=https://datasheet.ciiva.com/6362/bc846a-bc849csot-23-6362342.pdf?src-supplier=Digikey, ComponentLink3URL=https://datasheet.ciiva.com/6362/bc846a-bc849csot-23-6362342.pdf?src-supplier=Digikey, ComponentLink4Description=https://datasheet.ciiva.com/15200/getdatasheetpartid-334290-15200455.pdf?src-supplier=Verical, ComponentLink4URL=https://datasheet.ciiva.com/15200/getdatasheetpartid-334290-15200455.pdf?src-supplier=Verical, Gain Bandwidth Product=100MHz, Item Type=Mosfet, Lead Free="Lead Free", Manufacturer Part Number=BC849C-TP, Max Breakdown Voltage=30V, Mounting Technology="Surface Mount", Number of Elements=1, Packaging="Tape and Reel", Pins=3, Polarity=NPN, Power Dissipation=225mW, Pricing="3000=0.0323, 9000=0.0245, 24000=0.0235, 45000=0.0216, 99000=0.0186 (USD)", Radiation Hardening=No, Reach SVHC Compliant=Unknown, RoHS=Yes, RoHS Compliant=Yes, Series=BC849, Stock=3000, Supplier="Arrow Electronics", Supplier Part Number=BC849C-TP, Transition Frequency=100MHz
Q2: "30V 4.1A 60mΩ@10V,4.1A 350mW 3V@250uA P Channel SOT-23 MOSFETs ROHS", LCSC Part Number=C181093, Manufacturer="Guangdong Hottech", Package=SOT-23, ComponentLink1Description=LCSC, ComponentLink1URL=https://www.lcsc.com/product-detail/MOSFETs_Guangdong-Hottech-AO3407_C181093.html, Item Type=Mosfet, Manufacturer Part Number=AO3407
Q3: "40V 100mW 100@10mA,1V 200mA 300MHz 300mV@50mA,5mA NPN -55℃~+150℃@(Tj) SOT-723 Bipolar Transistors - BJT ROHS", LCSC Part Number=C2923360, Manufacturer="TECH PUBLIC", Package=SOT-723, ComponentLink1Description=LCSC, ComponentLink1URL=https://www.lcsc.com/product-detail/Bipolar-Transistors-BJT_TECH-PUBLIC-MMBT3904M_C2923360.html, Item Type=Mosfet, Manufacturer Part Number=MMBT3904M
R1: library part RT0603BRD07172KL, "RES 172K OHM 0.1% 1/10W 0603", Case/Package=0603, LCSC Part Number=C861162, Manufacturer=Yageo, Max Operating Temperature=155°C, Max Power Dissipation=100mW, Min Operating Temperature=-55°C, Resistance=172kR, Resistor Type="Thin Film", Supplier Part Number 1=603-RT0603BRD07172KL, Temperature Coefficient=25ppm/°C, Tolerance=0.1%, Category="Chip SMD Resistors", ComponentLink1Description=http://www.yageo.com/documents/recent/PYu-RT_1-to-0.01_RoHS_L_9.pdf?src-supplier=Digi-Key, ComponentLink1URL=http://www.yageo.com/documents/recent/PYu-RT_1-to-0.01_RoHS_L_9.pdf?src-supplier=Digi-Key, Item Type=Resistor, Manufacturer Part Number=RT0603BRD07172KL, Number of Terminations=2, Packaging="Tape and Reel", Pricing 1="1=0.33000, 10=0.27400, 50=0.27400, 100=0.10800, 1000=0.04500, 10000=0.03400 (USD)", RoHS=Yes, RoHS Compliant=Yes, Stock 1=2756, Supplier 1=Mouser
R2: library part RC0603FR-071KL, "RES SMD 1K OHM 1% 1/10W 0603", Case Code (Imperial)=0603, Case Code (Metric)=1608, LCSC Part Number=C22548, Manufacturer=Yageo, Max Operating Temperature=155°C, Min Operating Temperature=-55°C, Power Rating=100mW, Resistance=1kR, Supplier Part Number 1=311-1.00KHRDKR-ND, Temperature Coefficient=100ppm/°C, Tolerance=1%, Voltage Rating=50V, Case/Package=0603, ComponentLink1Description=https://www.verical.com/server-webapp/html/getDatasheet?partID=409289&src-supplier=Verical, ComponentLink1URL=https://www.verical.com/server-webapp/html/getDatasheet?partID=409289&src-supplier=Verical, ComponentLink2Description=http://documents.rs-components.com/techlib://itc_doclist_GB.htm?stockno=5048928&src-supplier=RSComponents, ComponentLink2URL=http://documents.rs-components.com/techlib://itc_doclist_GB.htm?stockno=5048928&src-supplier=RSComponents, ComponentLink3Description=http://www.yageo.com/documents/recent/PYu-RC0603_51_RoHS_L_4.pdf?src-supplier=Avnet+Europe, ComponentLink3URL=http://www.yageo.com/documents/recent/PYu-RC0603_51_RoHS_L_4.pdf?src-supplier=Avnet+Europe, ComponentLink4Description=http://www.farnell.com/datasheets/2167052.pdf?src-supplier=Element14, ComponentLink4URL=http://www.farnell.com/datasheets/2167052.pdf?src-supplier=Element14, ComponentLink5Description=http://www.farnell.com/datasheets/1868787.pdf?src-supplier=Element14, ComponentLink5URL=http://www.farnell.com/datasheets/1868787.pdf?src-supplier=Element14, ComponentLink6Description=http://www.yageo.com/documents/recent/PYu-RC_Group_51_RoHS_L_2.pdf?src-supplier=Avnet, ComponentLink6URL=http://www.yageo.com/documents/recent/PYu-RC_Group_51_RoHS_L_2.pdf?src-supplier=Avnet, ComponentLink7Description=https://www.verical.com/server-webapp/html/getDatasheet?partID=404327&src-supplier=Verical, ComponentLink7URL=https://www.verical.com/server-webapp/html/getDatasheet?partID=404327&src-supplier=Verical, ComponentLink8Description=http://www.farnell.com/datasheets/443971.pdf?src-supplier=Element14, ComponentLink8URL=http://www.farnell.com/datasheets/443971.pdf?src-supplier=Element14, Composition="Thick Film", Contact Plating=Tin,Matte, Depth=0.8mm, Height=0.45mm, Item Type=Resistor, Lead Free="Lead Free", Length=1.6mm, Manufacturer Part Number=RC0603FR-071KL, Military Standard=Not, Packaging="Tape and Reel", Pricing 1="1=0.1, 10=0.023, 100=0.0094, 1000=0.0042, 2500=0.0037 (USD)", Radiation Hardening=No, REACH SVHC="No SVHC", Stock 1=21472395, Supplier 1=Digi-Key, Termination=SMD/SMT
R3: library part CPF0805B390RE1, "Res Thin Film 0805 390 Ohm 0.1% 1/10W ±25ppm/°C Molded SMD SMD Paper T/R", Manufacturer="TE Connectivity Neohm", Supplier Part Number=A103202CT-ND, Category="Chip SMD Resistors", ComponentLink1Description=https://datasheet.ciiva.com/7943/eng-ds-1773200-j-7943773.pdf?src-supplier=Element14, ComponentLink1URL=https://datasheet.ciiva.com/7943/eng-ds-1773200-j-7943773.pdf?src-supplier=Element14, ComponentLink2Description=https://datasheet.ciiva.com/7943/eng-ds-1773200-j-7943799.pdf?src-supplier=Element14, ComponentLink2URL=https://datasheet.ciiva.com/7943/eng-ds-1773200-j-7943799.pdf?src-supplier=Element14, Manufacturer Part Number=CPF0805B390RE1, Pricing="1=0.39, 10=0.283, 50=0.2188, 100=0.1943, 500=0.14536 (USD)", RoHS=Yes, Stock=3823, Supplier=Digikey
R4: library part RV4NAYSD503A, "Potentiometer RV4 Series 1 Turn 50K Ohms 10% Tol Power 2W Slotted 0.875 In Shaft", Manufacturer="Precision Electronic Components", Max Power Dissipation=2W, Package=Custom, Package Quantity=100, Resistor Type=Carbon, Supplier Part Number=RV4N503C-ND, Tolerance=10%, Voltage Rating (DC)=500V, Actuator Diameter=0.249inch, Actuator Length=0.875inch, Category="Variable Resistors and Potentiometers", ComponentLink1Description=https://datasheet.ciiva.com/2152/milstylerv4-2152739.pdf?src-supplier=Digikey, ComponentLink1URL=https://datasheet.ciiva.com/2152/milstylerv4-2152739.pdf?src-supplier=Digikey, Diameter=28.4mm, Housing Material="Stainless Steel", Item Type=Potentiometer, Lead Free="Lead Free", Length=13.6mm, Manufacturer Part Number=RV4NAYSD503A, Mounting Technology=Panel, Number of Gangs=1, Number of Turns=1, Packaging=Bulk, Pricing="1=18.17, 10=16.774, 25=16.0752, 50=13.9784, 100=12.5806, 250=10.83328, 500=10.4838, 1000=9.78488 (USD)", Reach SVHC Compliant=Yes, RoHS=Yes, Series=RV4, Stock=1093, Supplier=Digikey, Taper=Linear, Termination=Solder
R5 R6 R9 R10 R15 R19 R20 R21 R22 R23 R24 R25 R26 R27: library part RC0603FR-07100RL, "RES SMD 100 OHM 1% 1/10W 0603", Case Code (Imperial)=0603, Case Code (Metric)=1608, LCSC Part Number=C105588, Manufacturer=Yageo, Max Operating Temperature=155°C, Max Power Dissipation=100mW, Min Operating Temperature=-55°C, Resistance Tolerance=1%, Resistor Type="Thick Film", Temperature Coefficient=100ppm/°C, Voltage Rating=50V, Case/Package=0603, Category="Chip SMD Resistors", Construction=Rectangular, Depth=0.8mm, Features="Moisture Resistant", Height=0.45mm, Item Type=Resistor, Lead Free="Lead Free", Length=1.6mm, Manufacturer Part Number=RC0603FR-07100RL, Military Standard=Not, Number of Pins=2, Number of Terminations=2, Packaging="Tape and Reel", Power Rating=100mW, Pricing 1="5000=0.00300, 5000=0.00200, 5000=0.00450, 50000=0.00410, 500000=0.00230, 2500000=0.00140 (USD)", REACH SVHC=Unknown, Resistance=100R, RoHS=Yes, RoHS Compliant=Yes, Series=RC, Size Code=0603, Stock 1=3800000, Supplier 1="Arrow Electronics", Supplier Part Number 1=RC0603FR-07100RL, Technology="THICK FILM", Termination=SMD/SMT, Tolerance=1%, Voltage Rating (DC)=50V, Width=0.8mm
R7 R8: library part AC0805JR-0710KL, "SMD Chip Resistor, 10 kOhm, ± 5%, 125 mW, 0805 [2012 Metric], Thick Film, General Purpose", Case Code (Imperial)=0805, Case Code (Metric)=2012, Manufacturer=Yageo, Max Operating Temperature=155°C, Max Power Dissipation=125mW, Min Operating Temperature=-55°C, Supplier Part Number=YAG3758CT-ND, Temperature Coefficient=100ppm/°C, Tolerance=5%, Voltage Rating=150V, Case/Package=0805, Category="Chip SMD Resistors", ComponentLink1Description=http://www.mouser.com/ds/2/447/yageodocoutput-1111992.pdf?src-supplier=Mouser, ComponentLink1URL=http://www.mouser.com/ds/2/447/yageodocoutput-1111992.pdf?src-supplier=Mouser, ComponentLink2Description=https://datasheet.octopart.com/AC0805JR-0710KL-Yageo-datasheet-151884373.pdf?src-supplier=Future+Electronics, ComponentLink2URL=https://datasheet.octopart.com/AC0805JR-0710KL-Yageo-datasheet-151884373.pdf?src-supplier=Future+Electronics, ComponentLink3Description=http://www.yageo.com/NewPortal/yageodocoutput?fileName=/pdf/R-Chip/PYu-AC_51_RoHS_L_6.pdf&src-supplier=Digikey, ComponentLink3URL=http://www.yageo.com/NewPortal/yageodocoutput?fileName=/pdf/R-Chip/PYu-AC_51_RoHS_L_6.pdf&src-supplier=Digikey, ComponentLink4Description=https://www.yageo.com/upload/media/product/productsearch/datasheet/rchip/PYu-AC_51_RoHS_L_7.pdf?src-supplier=Digikey, ComponentLink4URL=https://www.yageo.com/upload/media/product/productsearch/datasheet/rchip/PYu-AC_51_RoHS_L_7.pdf?src-supplier=Digikey, Features="Moisture Resistant,Automotive AEC-Q200", Height=0.024inch, Item Type=Resistor, Lead Free="Lead Free", Length=0.079inch, Manufacturer Part Number=AC0805JR-0710KL, Number of Terminations=2, Package=0805, Packaging="Tape and Reel", Power Rating=125mW, Pricing="1=0.1, 10=0.027, 50=0.0174, 100=0.0146, 500=0.01004, 1000=0.00868 (USD)", RoHS=Yes, RoHS Compliant=Yes, Series=AC, Stock=109979, Supplier=Digikey, Termination=SMD/SMT, Width=1.25mm
R11: library part RC0603JR-074K7L, "RES SMD 4.7K OHM 5% 1/10W 0603", Case Code (Imperial)=0603, Case Code (Metric)=1608, LCSC Part Number=C105428, Manufacturer=Yageo, Max Operating Temperature=155°C, Min Operating Temperature=-55°C, Power Rating=100mW, Resistance=4.7kR, Supplier Part Number 1=311-4.7KGRCT-ND, Temperature Coefficient=100ppm/°C, Tolerance=5%, Voltage Rating=50V, Case/Package=0603, ComponentLink1Description=http://www.farnell.com/datasheets/443971.pdf?src-supplier=Element14, ComponentLink1URL=http://www.farnell.com/datasheets/443971.pdf?src-supplier=Element14, Composition="Thick Film", Depth=0.8mm, Item Type=Resistor, Lead Free="Lead Free", Length=1.6mm, Manufacturer Part Number=RC0603JR-074K7L, Military Standard=Not, Number of Pins=2, Packaging="Tape and Reel", Pricing 1="1=0.1, 10=0.02, 100=0.0081, 1000=0.00362, 2500=0.00314 (USD)", REACH SVHC="No SVHC", Stock 1=19706643, Supplier 1=Digi-Key, Termination=SMD/SMT, Voltage Rating (DC)=50V, Width=0.8mm
R12: library part RC0603FR-07330KL, "RES 330K OHM 1% 1/10W 0603", Case Code (Imperial)=0603, Case Code (Metric)=1608, LCSC Part Number=C114618, Manufacturer=Yageo, Max Operating Temperature=155°C, Max Power Dissipation=100mW, Min Operating Temperature=-55°C, Resistance Tolerance=1%, Resistor Type="Thick Film", Supplier Part Number 1=9008384, Temperature Coefficient=100ppm/°C, Voltage Rating=75V, Voltage Rating (DC)=50V, Case/Package=0603, Category="Chip SMD Resistors", ComponentLink1Description=https://datasheet.ciiva.com/2455/pyu-r-int-thick-7-2455366.pdf?src-supplier=Digi-Key, ComponentLink1URL=https://datasheet.ciiva.com/2455/pyu-r-int-thick-7-2455366.pdf?src-supplier=Digi-Key, ComponentLink2Description=https://datasheet.ciiva.com/2455/pyu-r-int-thick-7-2455367.pdf?src-supplier=Digi-Key, ComponentLink2URL=https://datasheet.ciiva.com/2455/pyu-r-int-thick-7-2455367.pdf?src-supplier=Digi-Key, ComponentLink3Description=https://datasheet.ciiva.com/2455/pyu-r-int-thick-7-2455365.pdf?src-supplier=Digi-Key, ComponentLink3URL=https://datasheet.ciiva.com/2455/pyu-r-int-thick-7-2455365.pdf?src-supplier=Digi-Key, ComponentLink4Description=https://datasheet.ciiva.com/7746/443971-7746328.pdf?src-supplier=Element14, ComponentLink4URL=https://datasheet.ciiva.com/7746/443971-7746328.pdf?src-supplier=Element14, ComponentLink5Description=https://datasheet.ciiva.com/7746/443971-7746327.pdf?src-supplier=Element14, ComponentLink5URL=https://datasheet.ciiva.com/7746/443971-7746327.pdf?src-supplier=Element14, ComponentLink6Description=https://datasheet.ciiva.com/15189/getdatasheetpartid-323788-15189703.pdf?src-supplier=Verical, ComponentLink6URL=https://datasheet.ciiva.com/15189/getdatasheetpartid-323788-15189703.pdf?src-supplier=Verical, Construction=Rectangular, Depth=0.8mm, Features="Moisture Resistant", Height=0.45mm, Item Type=Resistor, Lead Free="Lead Free", Length=1.6mm, Manufacturer Part Number=RC0603FR-07330KL, Military Standard=Not, Number of Terminations=2, Packaging="Tape and Reel", Pins=2, Power Rating=100mW, Pricing 1="5000=0.0014, 50000=0.0013, 75000=0.0015, 200000=0.0012, 250000=0.0014, 625000=0.0012, 750000=0.0013, 2000000=0.0011, 2500000=0.0012 (USD)", Reach SVHC Compliant=No, RoHS=Yes, RoHS Compliant=Yes, Series=RC, Stock 1=1500000, Supplier 1="Future Electronics", Termination=SMD/SMT, Tolerance=1%, Weight=7.1E-05oz, Width=0.8mm
R18: library part RC0805FR-071KL, "RES 1K OHM 1% 1/8W 0805", Case Code (Imperial)=0805, Case Code (Metric)=2012, LCSC Part Number=C95781, Manufacturer=Yageo, Max Operating Temperature=155°C, Max Power Dissipation=125mW, Min Operating Temperature=-55°C, Package Quantity=1, Resistance Tolerance=1%, Resistor Type="Thick Film", Supplier Part Number=8126013, Temperature Coefficient=100ppm/°C, Voltage Rating=150V, Case/Package=0805, Category="Chip SMD Resistors", ComponentLink1Description=https://datasheet.ciiva.com/7941/1686128-7941719.pdf?src-supplier=Element14, ComponentLink1URL=https://datasheet.ciiva.com/7941/1686128-7941719.pdf?src-supplier=Element14, ComponentLink2Description=https://datasheet.ciiva.com/46385/444164-46385020.pdf?src-supplier=Element14, ComponentLink2URL=https://datasheet.ciiva.com/46385/444164-46385020.pdf?src-supplier=Element14, ComponentLink3Description=https://datasheet.ciiva.com/2456/pyu-r-int-thick-7-2456976.pdf?src-supplier=Digi-Key, ComponentLink3URL=https://datasheet.ciiva.com/2456/pyu-r-int-thick-7-2456976.pdf?src-supplier=Digi-Key, ComponentLink4Description=https://datasheet.ciiva.com/2456/pyu-r-int-thick-7-2456977.pdf?src-supplier=Digi-Key, ComponentLink4URL=https://datasheet.ciiva.com/2456/pyu-r-int-thick-7-2456977.pdf?src-supplier=Digi-Key, ComponentLink5Description=https://datasheet.ciiva.com/2456/pyu-r-int-thick-7-2456975.pdf?src-supplier=Digi-Key, ComponentLink5URL=https://datasheet.ciiva.com/2456/pyu-r-int-thick-7-2456975.pdf?src-supplier=Digi-Key, ComponentLink6Description=https://datasheet.ciiva.com/16850/rc0805-16850409.pdf?src-supplier=Future+Electronics, ComponentLink6URL=https://datasheet.ciiva.com/16850/rc0805-16850409.pdf?src-supplier=Future+Electronics, Construction=Rectangular, Depth=1.25mm, Features="Moisture Resistant", Height=0.024inch, Item Type=Resistor, Lead Free=5697LeadFree, Length=0.079inch, Manufacturer Part Number=RC0805FR-071KL, Military Standard=Not, Number of Terminations=2, Packaging="Tape and Reel", Pins=2, Power Rating=125mW, Pricing="5000=0.117, 25000=0.112, 125000=0.107, 500000=0.104, 1250000=0.0981 (USD)", Reach SVHC Compliant=No, RoHS=Yes, RoHS Compliant=Yes, Series=RC, Stock=8305000, Supplier="Future Electronics", Termination=SMD/SMT, Tolerance=1%, Voltage Rating (AC)=150V, Voltage Rating (DC)=150V, Width=0.049inch
SW1: "SWITCH TACTILE SPST-NO 0.05A 12V", Contact Current Rating=50mA, Contact Resistance=100mR, Insulation Resistance=100MR, LCSC Part Number=C231329, Manufacturer=Omron, Max Operating Temperature=70°C, Max Voltage Rating (DC)=12V, Min Operating Temperature=-25°C, Operating Force=1.5N, Package Quantity=1, Ratings="Dust Proof,IP40", Supplier Part Number 1=SW1020DKR-ND, Actuator Length=0.4mm, Actuator Type=Standard, ComponentLink1Description=http://www.farnell.com/datasheets/60838.pdf?src-supplier=Farnell, ComponentLink1URL=http://www.farnell.com/datasheets/60838.pdf?src-supplier=Farnell, ComponentLink2Description=http://www.farnell.com/datasheets/60838.pdf?src-supplier=Element14, ComponentLink2URL=http://www.farnell.com/datasheets/60838.pdf?src-supplier=Element14, ComponentLink3Description=https://omronfs.omron.com/en_US/ecb/products/pdf/en-b3u.pdf?src-supplier=Digi-Key, ComponentLink3URL=https://omronfs.omron.com/en_US/ecb/products/pdf/en-b3u.pdf?src-supplier=Digi-Key, ComponentLink4Description=http://www.omron.com/ecb/products/pdf/en-b3u.pdf?src-supplier=Digi-Key, ComponentLink4URL=http://www.omron.com/ecb/products/pdf/en-b3u.pdf?src-supplier=Digi-Key, ComponentLink5Description=https://www.distrelec.biz/Web/Downloads/he/et/B3U_eng_datasheet.pdf?mime=application%2Fpdf&src-supplier=Distrelec, ComponentLink5URL=https://www.distrelec.biz/Web/Downloads/he/et/B3U_eng_datasheet.pdf?mime=application%2Fpdf&src-supplier=Distrelec, ComponentLink6Description=http://www.onlinecomponents.com/productFiles/mf-OM/en-b3u.pdf?src-supplier=Onlinecomponents.com, ComponentLink6URL=http://www.onlinecomponents.com/productFiles/mf-OM/en-b3u.pdf?src-supplier=Onlinecomponents.com, ComponentLink7Description=https://www.verical.com/server-webapp/html/getDatasheet?partID=552554&src-supplier=Verical, ComponentLink7URL=https://www.verical.com/server-webapp/html/getDatasheet?partID=552554&src-supplier=Verical, ComponentLink8Description=http://www.farnell.com/datasheets/1685550.pdf?src-supplier=Element14, ComponentLink8URL=http://www.farnell.com/datasheets/1685550.pdf?src-supplier=Element14, ComponentLink9Description=http://www.farnell.com/datasheets/2610940.pdf?src-supplier=Farnell, ComponentLink9URL=http://www.farnell.com/datasheets/2610940.pdf?src-supplier=Farnell, ComponentLink10Description=https://www.alliedelec.com/m/d/4c8a9ef82804fc3c241a13c1e298fd73.pdf?src-supplier=Allied+Electronics, ComponentLink10URL=https://www.alliedelec.com/m/d/4c8a9ef82804fc3c241a13c1e298fd73.pdf?src-supplier=Allied+Electronics, Contact Material=Silver, Current Rating=50mA, Depth=2.5mm, Electrical Life=200000Cycles, Height=1.2mm, Illumination Type=Non-Illuminated,Illuminated, Item Type=Switch, Lead Free="Lead Free", Length=4mm, Manufacturer Part Number=B3U-1000P, Max Current Rating=50mA, Mechanical Life=200000Cycles, Mount="Surface Mount", Orientation=Straight, Packaging="Tape and Reel", Pricing 1="1=1, 10=0.961, 25=0.9064, 50=0.7976, 100=0.7251, 250=0.68888, 500=0.67074, 1000=0.52571 (USD)", REACH SVHC=Unknown, Stock 1=116454, Supplier 1=Digi-Key, Switch Function=Off-Mom, Switch Travel=0.15mm, Termination=SMD/SMT, Throw Configuration=SPST, Voltage Rating (DC)=12V, Weight=0.000776oz, Width=3mm
U1: "IC REG LDO 3.3V 0.3A SOT23-5", Manufacturer=Richtek, Supplier Part Number=1028-1014-1-ND, Category="Voltage Regulators - Linear", ComponentLink1Description=https://datasheet.ciiva.com/2046/3d3futf-83fb3frfm5mtkzlte2lnbkzg3d3d3f3d-2046896.pdf?src-supplier=Digi-Key, ComponentLink1URL=https://datasheet.ciiva.com/2046/3d3futf-83fb3frfm5mtkzlte2lnbkzg3d3d3f3d-2046896.pdf?src-supplier=Digi-Key, ComponentLink2Description=https://datasheet.ciiva.com/28652/1782157-28652989.pdf?src-supplier=Element14, ComponentLink2URL=https://datasheet.ciiva.com/28652/1782157-28652989.pdf?src-supplier=Element14, Manufacturer Part Number=RT9193-33GB, Pricing="1=0.53, 10=0.454, 25=0.424, 100=0.3394, 250=0.31512, 500=0.26664, 1000=0.20604 (USD)", RoHS=Yes, Stock=7748, Supplier=Digi-Key
U2: "IC MCU 32BIT 64KB FLASH 100LQFP", Case/Package=LQFP, LCSC Part Number=C2971584, Manufacturer=STMicroelectronics, Max Operating Temperature=85°C, Min Operating Temperature=-40°C, Supplier Part Number=497-17920-ND, Category=Microcontrollers, ComponentLink1Description=http://www.st.com/content/ccc/resource/technical/document/datasheet/b5/24/80/11/51/59/47/f7/DM00141136.pdf/files/DM00141136.pdf/jcr:content/translations/en.DM00141136.pdf?src-supplier=Digikey, ComponentLink1URL=http://www.st.com/content/ccc/resource/technical/document/datasheet/b5/24/80/11/51/59/47/f7/DM00141136.pdf/files/DM00141136.pdf/jcr:content/translations/en.DM00141136.pdf?src-supplier=Digikey, ComponentLink2Description=LCSC, ComponentLink2URL=https://www.lcsc.com/product-detail/Microcontroller-Units-MCUs-MPUs-SOCs_STMicroelectronics-STM32L071V8T6_C2971584.html, Core Architecture=ARM, Interface=I2C,SPI,IrDA,UART,USART, Item Type=IC, Manufacturer Part Number=STM32L071V8T6, Memory Format=FLASH, Memory Size=64KB, Number of I/Os=84, Oscillator Type=Internal, Packaging=Tray, Peripherals="Brown-out Detect/Reset,POR,PWM,WDT,DMA", Pricing="1=5.13, 10=4.606, 25=4.3544, 80=3.77375, 230=3.58022, 540=3.21254, 1080=2.70936, 2700=2.5739 (USD)", RoHS=Yes, RoHS Compliant=Yes, Series=STM32L0, Stock=394, Supplier=Digikey
U3 U5: "MC14511BDG; Decoder; Driver; Latch; Non-Inverting; 3 - 18 V; 16-Pin SOIC", LCSC Part Number=C906828, Manufacturer="ON Semiconductor", Supplier Part Number=MC14511BDGOS-ND, Category="Latches and Flip Flops", ComponentLink1Description=https://datasheet.ciiva.com/15092/getdatasheetpartid-72059-15092223.pdf?src-supplier=Verical, ComponentLink1URL=https://datasheet.ciiva.com/15092/getdatasheetpartid-72059-15092223.pdf?src-supplier=Verical, ComponentLink2Description=https://datasheet.ciiva.com/8251/mc14511b-d-8251726.pdf?src-supplier=Avnet, ComponentLink2URL=https://datasheet.ciiva.com/8251/mc14511b-d-8251726.pdf?src-supplier=Avnet, ComponentLink3Description=https://datasheet.ciiva.com/1940/mc14511b-d-1940500.pdf?src-supplier=Digikey, ComponentLink3URL=https://datasheet.ciiva.com/1940/mc14511b-d-1940500.pdf?src-supplier=Digikey, ComponentLink4Description=https://datasheet.ciiva.com/16446/mc14511b-d-16446076.pdf?src-supplier=Future+Electronics, ComponentLink4URL=https://datasheet.ciiva.com/16446/mc14511b-d-16446076.pdf?src-supplier=Future+Electronics, ComponentLink5Description=LCSC, ComponentLink5URL=https://www.lcsc.com/product-detail/Signal-Switches-Encoders-Decoders-Multiplexers_onsemi-MC14511BDG_C906828.html, Item Type=IC, Manufacturer Part Number=MC14511BDG, Number of Channels=1NUMBER, Pricing="1=0.87, 10=0.78, 48=0.74042, 144=0.56847, 288=0.5024, 528=0.47595, 1008=0.37019, 2544=0.35167, 5040=0.33845 (USD)", RoHS=Yes, Stock=462, Supplier=Digikey